# Altium PCB 1SL1 Xilinx Spartan-11E PQ208.PcbDoc (part 1 of 5)
Units mil, origin at the board's own origin, x right, y up, seen from the top; angles counter-clockwise.
Board outline 7086.61 x 1988.19 mil, 2 copper layers (Top Layer, Bottom Layer), stack 29.698 mil thick; 115 components, 126 nets, 642 pads, 225 vias.
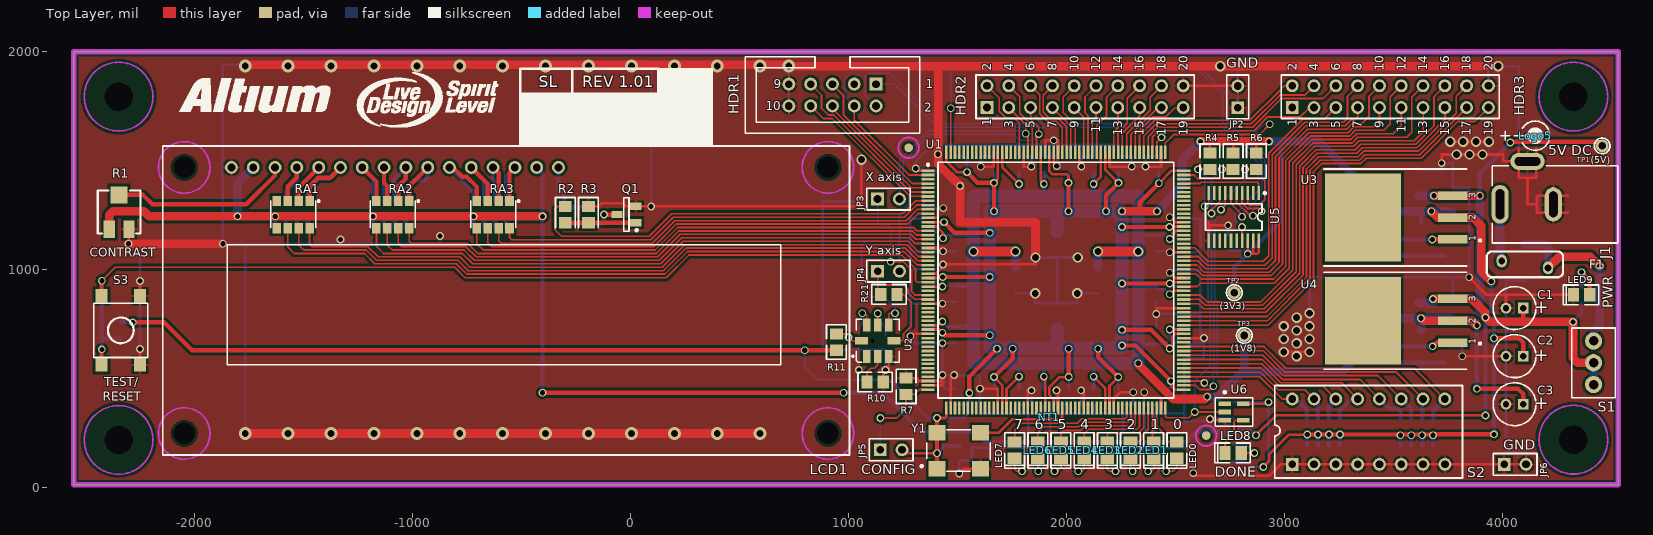
[diagram p0: Top Layer view]
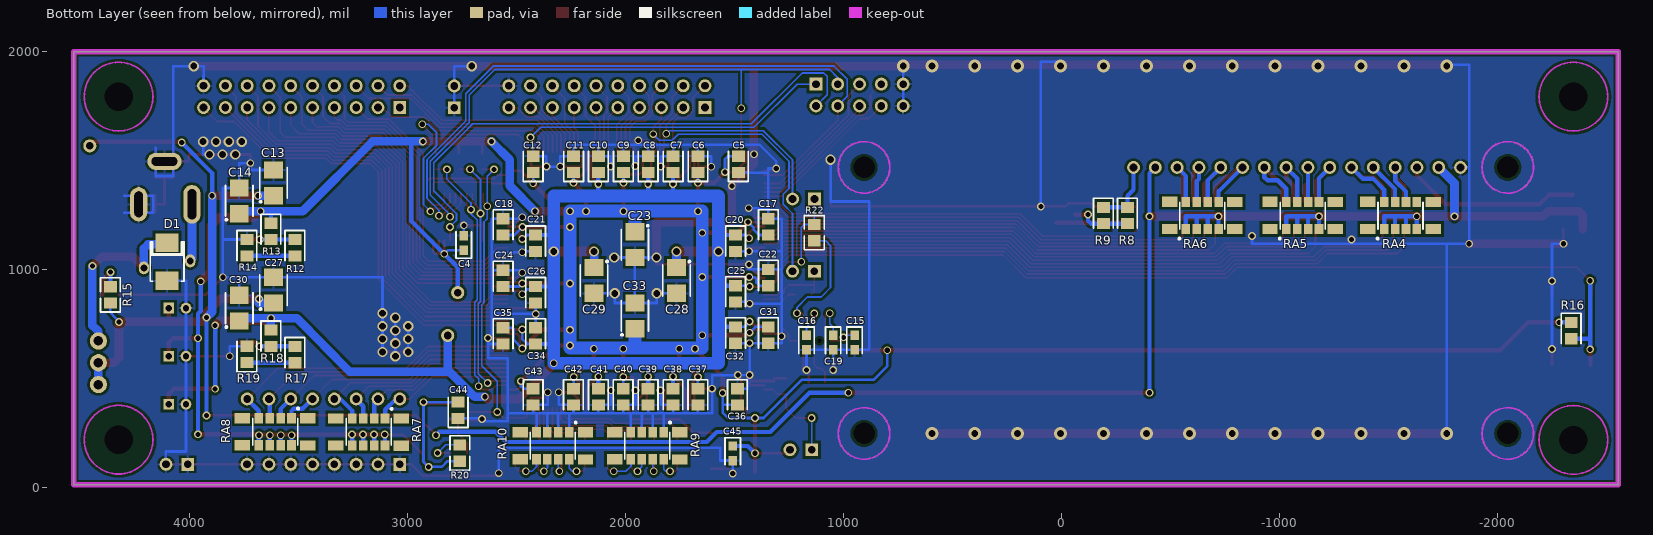
[diagram p1: Bottom Layer view, seen from below]

## Layer stack, top to bottom
Top Solder: solder mask 0.4, Solder Resist, Dk 3.5
Top Layer: signal copper 1.4
Dielectric 1: core 26.898, FR-4, Dk 4.2
Bottom Layer: signal copper 1.4
Bottom Solder: solder mask 0.4, Solder Resist, Dk 3.5

## Board outline
-2555.06,9.87 4531.55,9.87 4531.55,1998.06 -2555.06,1998.06

## Design rules (kind name [scope] priority, off if disabled: settings)
Clearance "Clearance_Power Polygon" [inpolygon and innetclass('Power')] p1: gap=11.81 ignorepadtopadclearanceinfootprint=FALSE except(0: Arc-Hole Track-Hole SMDPad-Hole THPad-Hole Via-Hole Fill-Hole Poly-Hole Region-Hole Text-Hole)
Clearance [All] p2: gap=7.87 ignorepadtopadclearanceinfootprint=FALSE except(0: Arc-Hole Track-Hole SMDPad-Hole THPad-Hole Via-Hole Fill-Hole Poly-Hole Region-Hole Text-Hole) // General
ComponentClearance ComponentClearance_D1_F1 [InComponent('D1') vs InComponent('F1')] p1 off: gap=1.18 collisioncheckmode=3 verticalgap=10 showdistances=FALSE
ComponentClearance ComponentClearance_JP4_R21 [InComponent('JP4') vs InComponent('R21')] p2 off: gap=2.76 collisioncheckmode=3 verticalgap=10 showdistances=FALSE
ComponentClearance ComponentClearance_LCD1_U2 [InComponent('LCD1') vs InComponent('U2')] p3 off: gap=3.54 collisioncheckmode=3 verticalgap=10 showdistances=FALSE
ComponentClearance ComponentClearance_U1_U6 [InComponent('U1') vs InComponent('U6')] p4 off: gap=3.94 collisioncheckmode=3 verticalgap=10 showdistances=FALSE
ComponentClearance ComponentClearance_S2 [InComponent('S2') vs InComponent('RA7') Or InComponent('RA8')] p5 off: gap=3.94 collisioncheckmode=3 verticalgap=10 showdistances=FALSE // Why is such a small clearance necessary?
ComponentClearance ComponentClearance_LCD1_R11 [InComponent('LCD1') vs InComponent('R11')] p6 off: gap=6.3 collisioncheckmode=3 verticalgap=10 showdistances=FALSE
ComponentClearance ComponentClearance_J1_Logo5 [InComponent('J1') vs InComponent('Logo5')] p7 off: gap=7.48 collisioncheckmode=3 verticalgap=10 showdistances=FALSE
ComponentClearance ComponentClearance_R2_R3 [InComponent('R2') vs InComponent('R3')] p8 off: gap=7.48 collisioncheckmode=3 verticalgap=10 showdistances=FALSE
ComponentClearance ComponentClearance_R5 [InComponent('R5') vs InComponent('R4') Or InComponent('R6')] p9 off: gap=7.48 collisioncheckmode=3 verticalgap=10 showdistances=FALSE
ComponentClearance ComponentClearance_LEDs [HasFootprint('SMD _LED') vs HasFootprint('SMD _LED')] p10 off: gap=7.48 collisioncheckmode=3 verticalgap=10 showdistances=FALSE
ComponentClearance ComponentClearance_R7_R10 [InComponent('R7') vs InComponent('R10')] p11 off: gap=9.45 collisioncheckmode=3 verticalgap=10 showdistances=FALSE
ComponentClearance ComponentClearance_U1 [InComponent('U1') vs Not InComponent('NT1') && Not InComponent('LED8')] p12 off: gap=10 collisioncheckmode=3 verticalgap=10 showdistances=FALSE
ComponentClearance ComponentClearance_General [Not InComponent('U1') vs Not InComponent('U1')] p13 off: gap=10 collisioncheckmode=3 verticalgap=10 showdistances=FALSE
ComponentClearance ComponentClearance_Default [All] p14: gap=5 collisioncheckmode=3 verticalgap=10 showdistances=FALSE
FabricationTestPointUsage TestPointUsage [All] p1 off: valid=0 allowmultiple=FALSE
FabricationTestpoint Testpoint [All] p1 off: side=3 testpointundercomponent=TRUE minsize=40 maxsize=100 preferedsize=60 minholesize=0 maxholesize=40 preferedholesize=32 testpointgrid=1 allowsidetop=TRUE allowsidebottom=TRUE usegrid=TRUE gridtolerance=0.01
HoleSize [All] p1: absolutevalues=TRUE maxlimit=130 minlimit=0 maxpercent=80.000 minpercent=20.000
PlaneConnect [All] p1: planeconnectstyle=Relief reliefexpansion=11.81 reliefentries=4 reliefconductorwidth=7.87 reliefairgap=7.87
PolygonConnect PolygonConnect_Power [innetclass('Power')] p1: thpad.connectstyle=Relief thpad.reliefconductorwidth=11.81 thpad.reliefentries=4 thpad.polygonreliefangle="90 Angle" thpad.airgapwidth=10 smdpad.connectstyle=Relief smdpad.reliefconductorwidth=11.81 smdpad.reliefentries=4 smdpad.polygonreliefangle="90 Angle" smdpad.airgapwidth=10 via.connectstyle=Direct via.reliefconductorwidth=11.81 via.reliefentries=4 via.polygonreliefangle="90 Angle" via.airgapwidth=10
PolygonConnect [All] p2: connectstyle=Relief reliefconductorwidth=7.87 reliefentries=4 polygonreliefangle="90 Angle" airgapwidth=10
RoutingVias RoutingVias_Power [innetclass('Power')] p1: holewidth=23.62 width=35.43 viastyle="Through Hole" minholewidth=23.62 minwidth=35.43 maxholewidth=31.5 maxwidth=59.06
RoutingVias [All] p2: holewidth=23.62 width=35.43 viastyle="Through Hole" minholewidth=23.62 minwidth=35.43 maxholewidth=23.62 maxwidth=35.43
SilkToSolderMaskClearance SilkscreenOverComponentPads [IsPad] p1: minsilkscreentomaskgap=10 clearancetoexposedcopper=TRUE
SolderMaskExpansion SolderMaskExpansion_Power_Vias [isvia] p1: expansion=0 istentingtop=FALSE
SolderMaskExpansion [All] p2: expansion=3.94 istentingtop=FALSE
Width Width_Power [innetclass('Power') and not inpolygon] p1: maxlimit=78.74 minlimit=11.81 preferedwidth=11.81
Width [All] p2: maxlimit=78.74 minlimit=7.87 preferedwidth=7.87
24 further rules are at their usual default settings.

## Classes and differential pairs
net class Power: 5V GND VCCINT VCCO

## Components (designator, comment, footprint, x,y, rotation, side; value= is the part's Value field where it differs from the comment)
C1 "100uF 16V" CAPPR2-5X6.8 4055.17,820.9 r180 top
C2 "100uF 16V" CAPPR2-5X6.8 4055.17,600.43 r180 top
C3 "100uF 16V" CAPPR2-5X6.8 4055.17,379.95 r180 top
C4 "10nF" CC1608-0603 2741.2,1120.11 r90 bottom
C5 "0.1uF" CC2012-0805 1482.34,1480.35 r90 bottom
C6 "0.1uF" CC2012-0805 1667.38,1480.35 r90 bottom
C7 "0.1uF" CC2012-0805 1781.55,1480.35 r90 bottom
C8 "0.1uF" CC2012-0805 1895.72,1480.35 r90 bottom
C9 "0.1uF" CC2012-0805 2009.9,1480.35 r90 bottom
C10 "0.1uF" CC2012-0805 2124.07,1480.35 r90 bottom
C11 "0.1uF" CC2012-0805 2238.24,1480.35 r90 bottom
C12 "0.1uF" CC2012-0805 2423.28,1480.35 r90 bottom
C13 "10uF" MCCT-B 3614.23,1395.7 r90 bottom
C14 "10uF" MCCT-B 3771.71,1313.02 r90 bottom
C15 "100nF" CC1608-0603 948.87,663.42 r270 bottom
C16 "100nF" CC1608-0603 1169.35,663.42 r270 bottom
C17 "0.1uF" CC2012-0805 1344.54,1193.93 r270 bottom
C18 "0.1uF" CC2012-0805 2561.08,1193.93 r270 bottom
C19 "100nF" CC1608-0603 1047.3,663.42 r270 bottom
C20 "0.1uF" CC2012-0805 1494.15,1119.13 r270 bottom
C21 "0.1uF" CC2012-0805 2411.47,1119.13 r270 bottom
C22 "0.1uF" CC2012-0805 1344.54,961.65 r270 bottom
C23 "10uF" MCCT-B 1956.75,1112.24 r270 bottom
C24 "0.1uF" CC2012-0805 2561.08,957.71 r270 bottom
C25 "0.1uF" CC2012-0805 1494.15,886.84 r270 bottom
C26 "0.1uF" CC2012-0805 2411.47,882.91 r270 bottom
C27 "10uF" MCCT-B 3614.23,903.57 r90 bottom
C28 "10uF" MCCT-B 1765.8,947.87 r270 bottom
C29 "10uF" MCCT-B 2143.76,947.87 r270 bottom
C30 "10uF" MCCT-B 3771.71,820.9 r90 bottom
C31 "0.1uF" CC2012-0805 1344.54,697.87 r270 bottom
C32 "0.1uF" CC2012-0805 1494.15,697.87 r270 bottom
C33 "10uF" MCCT-B 1956.75,785.46 r90 bottom
C34 "0.1uF" CC2012-0805 2411.47,693.93 r270 bottom
C35 "0.1uF" CC2012-0805 2561.08,693.93 r270 bottom
C36 "0.1uF" CC2012-0805 1486.28,414.4 r270 bottom
C37 "0.1uF" CC2012-0805 1667.38,414.4 r270 bottom
C38 "0.1uF" CC2012-0805 1781.55,414.4 r270 bottom
C39 "0.1uF" CC2012-0805 1895.72,414.4 r270 bottom
C40 "0.1uF" CC2012-0805 2009.9,414.4 r270 bottom
C41 "0.1uF" CC2012-0805 2124.07,414.4 r270 bottom
C42 "0.1uF" CC2012-0805 2238.24,414.4 r270 bottom
C43 "0.1uF" CC2012-0805 2423.28,414.4 r270 bottom
C44 "0.1uF" CC2012-0805 2767.77,352.39 r90 bottom
C45 "10nF" CC1608-0603 1507.93,155.54 r270 bottom
D1 "SM6T6V8A" DO214 4102.42,1033.46 r90 bottom
F1 "Polyswitch, 1.1A" RUE160_0.2 4102.42,1021.68 r0 top
HDR1 "Header 5X2" HDR2X5_LP 1126.04,1848.46 r0 top
HDR2 "Header 10X2" HDR2X10 1635.49,1740.58 r0 top locked
HDR3 "Header 10X2" HDR2X10 3035.49,1740.58 r0 top locked
J1 "KLD-0202-B" KLD-0202 4527.61,1297.28 r180 top
JP2 "GND" HDR1X2 2785.49,1740.58 r90 top locked
JP3 "X axis" HDR1X2 1133.65,1321.29 r0 top
JP4 "Y axis" HDR1X2 1133.91,990.19 r0 top
JP5 "CONFIG" HDR1X2 1145.72,171.29 r0 top
JP6 "GND" HDR1X2 4007.93,104.36 r0 top
LCD1 "162A" 162A -1830.65,1466.57 r0 top locked
LED0 "HSMH-C170" "SMD _LED" 2505.96,170.31 r90 top
LED1 "HSMH-C170" "SMD _LED" 2399.66,170.31 r90 top
LED2 "HSMH-C170" "SMD _LED" 2293.36,170.31 r90 top
LED3 "HSMH-C170" "SMD _LED" 2187.06,170.31 r90 top
LED4 "HSMH-C170" "SMD _LED" 2080.76,170.31 r90 top
LED5 "HSMH-C170" "SMD _LED" 1974.46,170.31 r90 top
LED6 "HSMH-C170" "SMD _LED" 1868.17,170.31 r90 top
LED7 "HSMH-C170" "SMD _LED" 1761.87,170.31 r90 top
LED8 "HSMH-C170" "SMD _LED" 2763.83,156.53 r0 top
LED9 "HSMH-C170" "SMD _LED" 4362.26,881.92 r0 top
Logo5 "5V" "5V SYMBOL" 4149.66,1612.24 r0 top
NT1 "GND" NT 1920.76,331.68 r270 top net-tie
Q1 "2N7002" SO-G3 -19.63,1250.03 r90 top
R1 "20K" POT4MM-2 -2346.4,1261.84 r90 top
R2 "560R" CC2012-0805 -299.16,1250.03 r270 top
R3 "10K" CC2012-0805 -192.86,1250.03 r270 top
R4 "4K7" CR2012-0805 2657.54,1495.11 r270 top
R5 "4K7" CR2012-0805 2763.83,1495.11 r270 top
R6 "4K7" CR2012-0805 2870.13,1495.11 r270 top
R7 "1K" CR2012-0805 1263.83,462.63 r270 top
R8 "68R" CC2012-0805 -303.09,1246.09 r270 bottom
R9 "68R" CC2012-0805 -192.86,1246.09 r270 bottom
R10 "680R" CR2012-0805 1122.1,482.31 r180 top
R11 "0R" CR2012-0805 944.15,665.39 r90 top
R12 "100R" CC2012-0805 3515.8,1098.45 r270 bottom
R13 "120R" CC2012-0805 3626.04,1173.25 r270 bottom
R14 "100R" CC2012-0805 3736.28,1098.45 r270 bottom
R15 "270R" CR2012-0805 4362.26,881.91 r270 bottom
R16 "4K7" CC2012-0805 -2338.53,718.53 r270 bottom
R17 "47R" CC2012-0805 3515.8,608.29 r270 bottom
R18 "120R" CC2012-0805 3626.04,683.1 r270 bottom
R19 "5R6" CC2012-0805 3736.28,608.3 r90 bottom
R20 "270R" CR2012-0805 2759.9,156.52 r270 bottom
R21 "100R" CR2012-0805 1185.09,883.89 r0 top
R22 "100R" CR2012-0805 1133.91,1167.35 r270 bottom
RA1 "270R" MNR34 -1547.19,1250.03 r270 top
RA2 "270R" MNR34 -1090.5,1250.03 r270 top
RA3 "270R" MNR34 -629.87,1250.03 r270 top
RA4 "4K7" MNR34T -1555.06,1246.09 r270 bottom
RA5 "4K7" MNR34T -1106.24,1246.09 r270 bottom
RA6 "4K7" MNR34T -645.61,1246.09 r270 bottom
RA7 "4K7" MNR34T 3177.42,252.96 r90 bottom
RA8 "4K7" MNR34T 3606.35,253.97 r90 bottom
RA9 "270R" MNR34T 1899.66,189.98 r90 bottom
RA10 "270R" MNR34T 2332.73,189.98 r90 bottom
S1 "TL36WW050" PCB_SWITCH 4417.57,470.06 r90 top
S2 "A6ER-8104" DIP-16-KEY 3035.49,104.36 r0 top
S3 "DTSM-61-NR" B3FS_SWITCH -2338.53,718.54 r270 top
TP1 "(5V)" TP 4456.75,1564.99 r0 top
TP2 "(3V3)" TP 2769.07,891.75 r0 top
TP3 "(1V8)" TP 2815.02,694.91 r0 top
U1 "XC2S300E-6PQ208C" PQ208 1950.84,949.83 r0 top locked
U2 "ADXL202E" E-8 1133.91,671.29 r90 top
U3 "LM1084IS-ADJ" TO-263 3771.71,1136.65 r90 top
U4 "LM1084IS-ADJ" TO-263 3771.71,663.42 r90 top
U5 "XCF02SVO20C" VO20 2766.79,1239.2 r180 top
U6 "SN74LVC1G04DBV" SO-G5/P.95 2767.77,344.52 r270 top
Y1 "25MHz" QSMO_4200 1405.57,68.93 r0 top

## Footprints (in the part's own frame and the unit in brackets; to place one, negate y for a bottom-side part, rotate by r counter-clockwise, add the part's x,y. Pads: shape width x height; smd on the part's side, far side on the other; paste and mask are expansions set on the pad)
"5V SYMBOL" [mil]
  silkscreen extent -158,-67 67,67
162A [mm]
  round 1.5 hole 0.9: 1(0,0) 2(2.54,0) 3(5.08,0) 4(7.62,0) 5(10.16,0) 6(12.7,0) 7(15.24,0) 8(17.78,0) 9(20.32,0) 10(22.86,0) 11(25.4,0) 12(27.94,0) 13(30.48,0) 14(33.02,0) 15(35.56,0) 16(38.1,0)
  round 2.3 hole 2.5 unplated: M1(-5.5,0) M2(69.5,0) M3(-5.5,-31) M4(69.5,-31)
  Keep-Out Layer circle w0.2: c69.5,0 r3
  Keep-Out Layer circle w0.2: c69.5,-31 r3
  Keep-Out Layer circle w0.2: c-5.5,-31 r3
  Keep-Out Layer circle w0.2: c-5.5,0 r3
  silkscreen extent -8,-33.5 72,2.5, body extent -8.01,-33.5 72,2.5, height 10.16
B3FS_SWITCH [mm]
  rect 1.6x1.4 smd: 1(3.998,-2.244) 2(-4.012,-2.244) 3(3.998,2.246) 4(-4.012,2.246)
  silkscreen extent -3.17,-3.15 3.14,3.16, body extent -4.57,-3.15 4.57,3.16, height 4.57
CAPPR2-5X6.8 [mm]
  rect 1.25x1.25 hole 0.75: 1(-0.994,-0.009)
  round 1.25 hole 0.75: 2(1.006,-0.009)
  silkscreen extent -2.49,-2.51 2.5,2.49, body extent -2.49,-2.51 2.51,2.49, height 10.16
CC1608-0603 [mm]
  rect 1.1x1 smd: 1(-0.843,0.001) 2(0.857,0.001)
  silkscreen extent -1.79,-0.9 1.31,0.9, body extent -1.46,-0.57 1.46,0.57, height 0.76
CC2012-0805 [mm]
  rect 1.3x1.5 smd: 1(-0.945,-0.007) 2(0.955,-0.007)
  silkscreen extent -1.99,-1.16 1.51,1.14, body extent -1.52,-0.7 1.52,0.7, height 0.76
CR2012-0805 [mm]
  rect 1.3x1.5 smd: 1(-0.946,0) 2(0.954,0)
  silkscreen extent -2,-1.15 2,1.15, body extent -1.52,-0.7 1.52,0.7, height 0.76
DIP-16-KEY [mm]
  rect 1.5x1.5 hole 0.9: 1(-0.011,0.001)
  round 1.5 hole 0.9: 2(2.529,0.001) 3(5.069,0.001) 4(7.609,0.001) 5(10.149,0.001) 6(12.689,0.001) 7(15.229,0.001) 8(17.789,0.001) 9(17.769,7.621) 10(15.229,7.621) 11(12.689,7.621) 12(10.149,7.621) 13(7.609,7.621) 14(5.069,7.621) 15(2.529,7.621) 16(-0.011,7.621)
  silkscreen extent -2.06,-1.59 19.82,9.2, body extent -2.03,-1.52 19.81,9.14, height 7.11
DO214 [mil]
  rect 85x106.3 smd: 1(-87.01,0.18) 2(87.99,0.18)
  silkscreen extent -90,-77 90,78, body extent -125,-50 125,50, height 50
E-8 [mil]
  round 15 hole 20 unplated: 0(-0.02,23.98)
  rect 60x35 smd: 1(-72.85,49.98) 2(-72.85,-0.02) 3(-72.85,-50.02) 5(72.82,-50.02) 6(72.82,-0.02) 7(72.82,49.98)
  rect 35x60 smd: 4(-0.02,-74.82) 8(-0.02,74.79)
  silkscreen extent -98,-98 99,118, body extent -95,-95 95,95, height 80
HDR1X2 [mm]
  rect 1.5x1.5 hole 0.9: 1(-0.011,0.007)
  round 1.5 hole 0.9: 2(2.529,0.007)
  silkscreen extent -1.28,-1.26 3.8,1.28, body extent -1.27,-1.27 3.81,1.27, height 10
HDR2X5_LP [mm]
  rect 1.5x1.5 hole 0.9: 1(0.003,0.004)
  round 1.5 hole 0.9: 2(0.003,-2.536) 3(-2.537,0.004) 4(-2.537,-2.536) 5(-5.077,0.004) 6(-5.077,-2.536) 7(-7.617,0.004) 8(-7.617,-2.536) 9(-10.157,0.004) 10(-10.157,-2.536)
  silkscreen extent -15.24,-5.71 5.08,3.18, body extent -15.24,-5.71 5.08,3.18, height 10
HDR2X10 [mm]
  rect 1.5x1.5 hole 0.9: 1(-0.011,0.007)
  round 1.5 hole 0.9: 2(-0.011,2.547) 3(2.529,0.007) 4(2.529,2.547) 5(5.069,0.007) 6(5.069,2.547) 7(7.609,0.007) 8(7.609,2.547) 9(10.149,0.007) 10(10.149,2.547) 11(12.689,0.007) 12(12.689,2.547) 13(15.229,0.007) 14(15.229,2.547) 15(17.769,0.007) 16(17.769,2.547) 17(20.309,0.007) 18(20.309,2.547) 19(22.849,0.007) 20(22.849,2.547)
  silkscreen extent -1.28,-1.26 24.12,3.82, body extent -1.27,-1.27 24.13,3.81, height 10
KLD-0202 [mm]
  oval 2x4.5 hole 1 slot 3.5 at 90 deg: 1(13.692,-0.001)
  oval 2x4 hole 1 slot 3 at 90 deg: 2(7.492,-0.001)
  oval 4x2 hole 1 slot 3 at 0 deg: 3(10.492,-5.001)
  silkscreen extent -0.01,-4.5 14.59,4.5, body extent 0,-4.44 14.6,4.45, height 7.62
MCCT-B [mm]
  rect 2x2.2 smd: 1(-1.505,-0.002) 2(1.495,-0.002)
  silkscreen extent -2.3,-1.6 1.8,1.6, body extent -2.29,-0.89 2.29,0.89, height 1.27
MNR34 [mm]
  rect 1.2x1 smd: 1(-1.578,1.898) 2(-1.578,0.628) 3(-1.578,-0.642) 4(-1.578,-1.912) 5(1.572,-1.912) 6(1.572,-0.642) 7(1.572,0.628) 8(1.572,1.898)
  silkscreen extent -1.68,-2.62 1.55,3.06, body extent -2.03,-2.29 2.03,2.29, height 1.27
MNR34T [mm]
  rect 1.2x1 smd: 1(1.575,-1.896) 2(1.575,-0.626) 3(1.575,0.644) 4(1.575,1.914) 5(-1.575,1.914) 6(-1.575,0.644) 7(-1.575,-0.626) 8(-1.575,-1.896)
  rect 1.2x1.8 smd: STP(-1.6,-3.801) STP(-1.575,3.819) STP(1.575,-3.801) STP(1.575,3.819)
  silkscreen extent -1.55,-2.76 2.79,2.62, body extent -1.65,-2.71 1.68,2.72, height 2
NT [mm]
  rect 0.2x0.2 smd: 1(0.01,0.011) 2(0.51,0.011)
  Top Layer lines w0.3: 0.51,0.011 0.01,0.011
PCB_SWITCH [mm]
  round 2 hole 1.1: 1(0.011,0.005) 2(2.551,0.005) 3(5.091,0.005)
  silkscreen extent -1.54,-2.53 6.59,2.55, body extent -1.52,-2.54 6.6,2.54, height 15
POT4MM-2 [mm]
  rect 2x1.3 smd: CCW(-2.008,-1.162) CW(-2.008,1.138)
  rect 2x2 smd: W(1.992,-0.012)
  silkscreen extent -2.51,-2.51 2.49,2.49, body extent -2.92,-2.41 2.92,2.41, height 3.05
PQ208 [mm]
  rect 1.55x0.3 smd: 1(-14.902,12.738) 2(-14.902,12.238) 3(-14.902,11.738) 4(-14.902,11.238) 5(-14.902,10.738) 6(-14.902,10.238) 7(-14.902,9.738) 8(-14.902,9.238) 9(-14.902,8.738) 10(-14.902,8.238) 11(-14.902,7.738) 12(-14.902,7.238) 13(-14.902,6.738) 14(-14.902,6.238) 15(-14.902,5.738) 16(-14.902,5.238) 17(-14.902,4.738) 18(-14.902,4.238) 19(-14.902,3.738) 20(-14.902,3.238) 21(-14.902,2.738) 22(-14.902,2.238) 23(-14.902,1.738) 24(-14.902,1.238) 25(-14.902,0.738) 26(-14.902,0.238) 27(-14.902,-0.262) 28(-14.902,-0.762) 29(-14.902,-1.262) 30(-14.902,-1.762) 31(-14.902,-2.262) 32(-14.902,-2.762) 33(-14.902,-3.262) 34(-14.902,-3.762) 35(-14.902,-4.262) 36(-14.902,-4.762) 37(-14.902,-5.262) 38(-14.902,-5.762) 39(-14.902,-6.262) 40(-14.902,-6.762) 41(-14.902,-7.262) 42(-14.902,-7.762) 43(-14.902,-8.262) 44(-14.902,-8.762) 45(-14.902,-9.262) 46(-14.902,-9.762) 47(-14.902,-10.262) 48(-14.902,-10.762) 49(-14.902,-11.262) 50(-14.902,-11.762) 51(-14.902,-12.262) 52(-14.902,-12.762) 105(14.898,-12.762) 106(14.898,-12.262) 107(14.898,-11.762) 108(14.898,-11.262) 109(14.898,-10.762) 110(14.898,-10.262) 111(14.898,-9.762) 112(14.898,-9.262) 113(14.898,-8.762) 114(14.898,-8.262) 115(14.898,-7.762) 116(14.898,-7.262) 117(14.898,-6.762) 118(14.898,-6.262) 119(14.898,-5.762) 120(14.898,-5.262) 121(14.898,-4.762) 122(14.898,-4.262) 123(14.898,-3.762) 124(14.898,-3.262) 125(14.898,-2.762) 126(14.898,-2.262) 127(14.898,-1.762) 128(14.898,-1.262) 129(14.898,-0.762) 130(14.898,-0.262) 131(14.898,0.238) 132(14.898,0.738) 133(14.898,1.238) 134(14.898,1.738) 135(14.898,2.238) 136(14.898,2.738) 137(14.898,3.238) 138(14.898,3.738) 139(14.898,4.238) 140(14.898,4.738) 141(14.898,5.238) 142(14.898,5.738) 143(14.898,6.238) 144(14.898,6.738) 145(14.898,7.238) 146(14.898,7.738) 147(14.898,8.238) 148(14.898,8.738) 149(14.898,9.238) 150(14.898,9.738) 151(14.898,10.238) 152(14.898,10.738) 153(14.898,11.238) 154(14.898,11.738) 155(14.898,12.238) 156(14.898,12.738)
  rect 0.3x1.55 smd: 53(-12.752,-14.912) 54(-12.252,-14.912) 55(-11.752,-14.912) 56(-11.252,-14.912) 57(-10.752,-14.912) 58(-10.252,-14.912) 59(-9.752,-14.912) 60(-9.252,-14.912) 61(-8.752,-14.912) 62(-8.252,-14.912) 63(-7.752,-14.912) 64(-7.252,-14.912) 65(-6.752,-14.912) 66(-6.252,-14.912) 67(-5.752,-14.912) 68(-5.252,-14.912) 69(-4.752,-14.912) 70(-4.252,-14.912) 71(-3.752,-14.912) 72(-3.252,-14.912) 73(-2.752,-14.912) 74(-2.252,-14.912) 75(-1.752,-14.912) 76(-1.252,-14.912) 77(-0.752,-14.912) 78(-0.252,-14.912) 79(0.248,-14.912) 80(0.748,-14.912) 81(1.248,-14.912) 82(1.748,-14.912) 83(2.248,-14.912) 84(2.748,-14.912) 85(3.248,-14.912) 86(3.748,-14.912) 87(4.248,-14.912) 88(4.748,-14.912) 89(5.248,-14.912) 90(5.748,-14.912) 91(6.248,-14.912) 92(6.748,-14.912) 93(7.248,-14.912) 94(7.748,-14.912) 95(8.248,-14.912) 96(8.748,-14.912) 97(9.248,-14.912) 98(9.748,-14.912) 99(10.248,-14.912) 100(10.748,-14.912) 101(11.248,-14.912) 102(11.748,-14.912) 103(12.248,-14.912) 104(12.748,-14.912) 157(12.748,14.888) 158(12.248,14.888) 159(11.748,14.888) 160(11.248,14.888) 161(10.748,14.888) 162(10.248,14.888) 163(9.748,14.888) 164(9.248,14.888) 165(8.748,14.888) 166(8.248,14.888) 167(7.748,14.888) 168(7.248,14.888) 169(6.748,14.888) 170(6.248,14.888) 171(5.748,14.888) 172(5.248,14.888) 173(4.748,14.888) 174(4.248,14.888) 175(3.748,14.888) 176(3.248,14.888) 177(2.748,14.888) 178(2.248,14.888) 179(1.748,14.888) 180(1.248,14.888) 181(0.748,14.888) 182(0.248,14.888) 183(-0.252,14.888) 184(-0.752,14.888) 185(-1.252,14.888) 186(-1.752,14.888) 187(-2.252,14.888) 188(-2.752,14.888) 189(-3.252,14.888) 190(-3.752,14.888) 191(-4.252,14.888) 192(-4.752,14.888) 193(-5.252,14.888) 194(-5.752,14.888) 195(-6.252,14.888) 196(-6.752,14.888) 197(-7.252,14.888) 198(-7.752,14.888) 199(-8.252,14.888) 200(-8.752,14.888) 201(-9.252,14.888) 202(-9.752,14.888) 203(-10.252,14.888) 204(-10.752,14.888) 205(-11.252,14.888) 206(-11.752,14.888) 207(-12.252,14.888) 208(-12.752,14.888)
  round 1 smd: FID1(-17.152,15.413) FID2(17.523,-18.112)
  Top Layer keep-out circle w0.2: c17.523,-18.137 r1.2
  Top Layer keep-out circle w0.2: c-17.152,15.413 r1.2
  silkscreen extent -15.03,-13.74 13.72,13.71, body extent -15.35,-15.36 15.35,15.34, height 2.5
QSMO_4200 [mm]
  rect 2x1.8 smd: 1(-0.009,0.39) 2(5.071,0.39) 3(5.071,4.59) 4(-0.009,4.59)
  silkscreen extent -1.91,0.09 6.21,4.94, body extent -1.14,-0.32 6.1,5.3, height 1.5
RUE160_0.2 [mm]
  oval 1.2x1.5 hole 0.8: 1(-2.7,0.4) 2(2.7,-0.4)
  silkscreen extent -4.45,-1.5 4.45,1.5, body extent -4.45,-1.5 4.45,1.5, height 12
"SMD _LED" [mm]
  rect 1.3x1.6 smd: 1(0.948,0.006) 2(-0.952,0.006)
  silkscreen extent -2.13,-1.14 2,1.16, body extent -1.52,-0.64 1.52,0.64, height 1.27
SO-G3 [mm]
  rect 0.85x1.3 smd: 1(-0.939,-1.107) 2(0.961,-1.107) 3(0.011,1.093)
  silkscreen extent -1.94,-1.33 1.96,0.29, body extent -1.65,-1.52 1.65,1.51, height 2.54
SO-G5/P.95 [mm]
  rect 0.55x1.45 smd: 1(-0.954,-1.07) 2(-0.004,-1.07) 3(0.946,-1.07) 4(0.946,1.08) 5(-0.954,1.08)
  silkscreen extent -2.43,-2.19 1.65,2.21, body extent -1.27,-1.78 1.27,1.78, height 0.89
TO-263 [mm]
  rect 1x3.4 smd: 1(-0.006,0.009) 2(2.534,0.009) 3(5.074,0.009)
  rect 10.25x8.9 smd: 4(2.534,10.459)
  silkscreen extent -3.11,-3.29 8.19,15.01, body extent -2.29,-1.14 7.37,14.35, height 2.03
TP [mil]
  round 60 hole 35.43: 1(0.14,0.45)
  silkscreen extent -36,-36 36,36, body extent -36,-36 36,36
VO20 [mm]
  rect 0.3x1.65 smd: 1(-2.929,-2.778) 2(-2.279,-2.778) 3(-1.629,-2.778) 4(-0.979,-2.778) 5(-0.329,-2.778) 6(0.321,-2.778) 7(0.971,-2.778) 8(1.621,-2.778) 9(2.271,-2.778) 10(2.921,-2.778) 11(2.921,2.772) 12(2.271,2.772) 13(1.621,2.772) 14(0.971,2.772) 15(0.321,2.772) 16(-0.329,2.772) 17(-0.979,2.772) 18(-1.629,2.772) 19(-2.279,2.772) 20(-2.929,2.772)
  silkscreen extent -3.75,-2.9 3.3,1.55, body extent -3.3,-3.56 3.3,3.55, height 1.52

## Part data
C1 C2 C3: library part CAP_POLAR_1, "Polar Capacitor"
C4 C5 C6 C7 C8 C9 C10 C11 C12 C15 C16 C17 C18 C19 C20 C21 C22 C24 C25 C26 C31 C32 C34 C35 C36 C37 C38 C39 C40 C41 C42 C43 C44 C45: library part CAP, "Capacitor"
  C4 C45: AEMS Code=2100341
  C5 C6 C7 C8 C9 C10 C11 C12 C17 C18 C20 C21 C22 C24 C25 C26 C31 C32 C34 C35 C36 C37 C38 C39 C40 C41 C42 C43 C44: Supplier=FARNELL, Supplier Code=317-287
  C15 C16 C19: AEMS Code=2101550
C13 C14 C23 C27 C28 C29 C30 C33: library part CAP_POLAR, "Polar Capacitor", Capacitor Type=Tant, AEMS Code=2100110, Supplier=FARNELL, Supplier Code=967-117
D1: library part BZG03C13, "Zener Diode, 6.2V, 5W", Manufacturer=Microsemi, Revision=31-Oct-2003
F1: library part "Fuse 2", "Polyswitch 1.1A, Raychem RUE110", Revision="July-2002: Re-released for DXP Platform.", Supplier=FARNELL, Supplier Code=608-907
HDR1: "Header, 5-Pin, Dual row", Revision="17-Jul-2002: Re-released for DXP Platform."
HDR2 HDR3: "Header, 10-Pin, Dual row", Revision="July-2002: Re-released for DXP Platform."
J1: "Low Voltage Power Supply Connector", Manufacturer=Kycon, AEMS Code=3510211
JP2 JP3 JP4 JP5 JP6: library part "Jumper, 2-Pin", "Jumper, 2-Pin"
LCD1: "16 char * 2 line LCD character display with b/light"
LED0 LED1 LED2 LED3 LED4 LED5 LED6 LED7 LED8 LED9: library part HSMX-C670, "Typical RED GaAs SMD LED Agilent make", AEMS Code=2610081, Revision="July-2002: Re-released for DXP Platform."
NT1: library part "Jumper, 2-Pin_1", "Jumper, 2-Pin"
Q1: "N Channel Mosfet"
R1: library part "RPot SM", "Square Trimming Potentiometer", AEMS Code=1400226
R2 R3 R4 R5 R6 R7 R8 R9 R11 R12 R13 R14 R15 R16 R17 R18 R19 R20: library part RES, "Resistor"
  R2: AEMS Code=1200723
  R3: AEMS Code=1200006JT
  R4 R5 R6 R16: AEMS Code=1200226
  R7: AEMS Code=1200008JN
  R8 R9: AEMS Code=1200821
  R11: AEMS Code=1200075
  R12 R14: AEMS Code=1200012JT
  R13 R18: AEMS Code=1200781
  R15 R20: AEMS Code=1200430
  R17: AEMS Code="CHANGED VALUE"
  R19: AEMS Code=1200069
R10 R21 R22: library part Res1, "Resistor", Revision="July-2002: Re-released for DXP Platform."
  R10: AEMS Code="CHANGED VALUE"
  R21 R22: AEMS Code=1200012JT
RA1 RA2 RA3 RA4 RA5 RA6 RA7 RA8 RA9 RA10: library part MNR34, "3216x4 Resistor Array"
  RA1 RA2 RA3 RA9 RA10: AEMS Code=1310010
  RA4 RA5 RA6 RA7 RA8: AEMS Code=1300330
S1: library part PCB_MOUNT_SWITCH, "SPDT Subminiature Toggle Switch", Supplier=FARNELL, Supplier Code=150-559
S2: "DIP Switch Side actuator long liver Piano Key", Revision="July-2002: Re-released for DXP Platform."
S3: library part B3FS, "SPNA SMD Keyboard Switch"
TP1 TP2 TP3: library part TestPin
U1: "Spartan-IIE 1.8V FPGA, 208-Pin PQFP, Standard Performance, Commercial Grade", PackageDocument="ver1.1, Oct-2002", Code_JEDEC=MS-029-FA-1, ComponentLink1Description="Manufacturer Link", ComponentLink1URL=http://www.xilinx.com/xlnx/xil_prodcat_landingpage.jsp?title=Spartan-IIE, DatasheetDocument=09-Jul-2003, LatestRevisionDate=17-Sep-2003, LatestRevisionNote="Pin names updated to match datasheet, ver2.1.", PackageReference=PQ208, Published=19-Jul-2002, Publisher="Altium Limited"
U2: "Accelerometer with Digital Output"
U3 U4: "5A Low Dropout Possitive Regulators"
U5: "XCF00S Series, Platform Flash In-System Programmable Configuration 3.3V PROM, 20-Pin TSOP, 2-Megabit, Commercial Grade", PackageDocument="ver1.0, May-2003", AEMS Code="CHANGED VALUE", Code_JEDEC=MO-153-AC, DatasheetDocument="ver2.3, May-2004", PackageReference=VO20
U6: library part SN74AHC1G04DBVR, Manufacturer=TI
Y1: library part QSMO_4200, "Surface Mount Crystal Oscillator"

## Free pads (board coordinates)
  round 35.43 hole 23.62 mask+3.94: 0(1430.17,660.46)
  round 118.11 hole 129.92 unplated: M3(-2348.37,216.57) M3(-2348.37,1791.37) M3(4324.86,1791.37) M3(4324.86,217.55)

## Via types
v1: diameter 35.43, hole 23.62, Top Layer to Bottom Layer, tented both sides, 168 vias
v2: diameter 59.06, hole 31.5, Top Layer to Bottom Layer, tented both sides, 27 vias
v3: diameter 47.24, hole 31.5, Top Layer to Bottom Layer, 18 vias
v4: diameter 47.24, hole 31.5, Top Layer to Bottom Layer, tented both sides, 11 vias
v5: diameter 35.43, hole 23.62, Top Layer to Bottom Layer, 1 vias

## Nets (pads, with @x,y where several pads share a name; then routed paths per layer and width w, separated by ;. In a path a pad name is that pad's centre, name@x,y a point inside that pad or via, vN(x,y) a via of type N, cw(c..) or ccw(c..) an arc to the next point about the centre after c; other vN are vias at no path point)
5V: C1.1 C13.1 C27.1 LCD1.2 LCD1.15 R1.CW R15.2 RA4.1 RA4.2 RA4.3 RA4.4 RA5.1 RA5.2 RA5.3 RA5.4 RA6.1 RA6.2 RA6.3 RA6.4 S1.1 S1.2 TP1.1 U3.3 U4.3 | length 12355.5
  Top Layer w11.81: v1(2869.15,238.22) 2959.7,328.77 v1(3921.32,328.77)
  Top Layer w19.68: v1(-403.49,433.1) v1(977.42,433.1) ; v1(4035.49,1580.74) 4039.43,1584.68 4444.94,1584.68 TP1.1@4464.62,1564.99 ; 4094.54,757.91 C1.1@4094.54,820.9
  Top Layer w39.37: R1.CW@-2391.68,1183.1 -2391.68,1248.06 -2373.96,1265.78 -2232.23,1265.78 -2208.61,1242.16 v1(-403.49,1242.16) ; v1(3681.16,863.22) 3858.32,864.2 3921.32,801.21 v1(3921.32,778.57) 3941.98,757.91 v1(4322.89,757.91) 4322.89,592.55 4344.94,570.5 S1.2@4417.38,570.5 ; v1(3685.09,1336.65) v1(3895.72,1336.65)
  Bottom Layer w11.81: v1(4322.89,757.91) 4362.26,801.21 R15.2@4362.26,844.52
  Bottom Layer w19.68: RA4.4@-1630.06,1184.09 v1(-1629.87,1242.16) -1479.87,1242.16 ; RA4.3@-1580.06,1184.09 -1580.06,1241.96 ; RA4.2@-1530.06,1184.09 -1530.06,1241.96 ; RA4.1@-1480.06,1184.09 -1480.06,1241.96 ; RA5.4@-1181.24,1184.09 v1(-1181.05,1242.16) -1031.05,1242.16 ; RA5.3@-1131.24,1184.09 -1131.24,1241.96 ; RA5.2@-1081.24,1184.09 -1081.24,1241.96 ; RA5.1@-1031.24,1184.09 -1031.24,1241.96 ; RA6.4@-720.61,1184.09 v1(-720.42,1242.16) -570.42,1242.16 ; RA6.3@-670.61,1184.09 -670.61,1241.96 ; RA6.2@-620.61,1184.09 -620.61,1241.96 ; RA6.1@-570.61,1184.09 -570.61,1241.96 ; LCD1.15@-430.65,1466.57 -403.49,1439.4 v1(-403.49,433.1) ; v1(977.42,433.1) 1155.57,433.1 1334.7,253.97 1580.76,252.98 1627.02,206.72 2547.3,206.72 2594.54,253.97 2853.4,253.97 v1(2869.15,238.22) ; v1(3895.72,1336.65) 3895.72,1440.98 v1(4035.49,1580.74) ; v1(3921.32,328.77) v1(3921.32,778.57)
  Bottom Layer w39.37: v1(-1803.09,1242.16) -1803.09,1394.13 LCD1.2@-1730.65,1466.57 ; C27.1@3614.23,844.52 3681.16,844.52 v1(3681.16,863.22) ; C13.1@3614.23,1336.65 v1(3685.09,1336.65) ; v1(3895.72,1336.65) 3895.72,804.17 v1(3921.32,778.57) ; S1.1@4417.38,470.5 S1.2@4417.38,570.5
CCLK: U1.155 U5.3 | length 609.9
  Top Layer w7.87: U1.155@2537.46,1432.12 2583.72,1432.12 2600.45,1415.39 2899.66,1415.39 2909.5,1405.54 2909.5,1316.96 2886.87,1294.32 2837.65,1294.32 2830.76,1301.21 U5.3@2830.76,1348.46
CLK_BRD: NT1.2 U1.80 Y1.3 | length 446
  Top Layer w11.81: Y1.3@1605.57,250.03 1689.03,250.03 1750.06,311.06 1970.53,311.06 1980.28,320.81 U1.80@1980.28,362.75
CLK_BRD_1: NT1.1 U1.77
DIN: U1.153 U5.1 | length 393.1
  Top Layer w7.87: U1.153@2537.46,1392.75 2612.26,1392.75 2618.17,1398.65 2875.06,1398.65 2881.94,1391.76 U5.1@2881.94,1348.46
DONE: R4.2 U1.104 U5.10 U6.2 | length 1614
  Top Layer w7.87: U1.104@2452.81,363.22 2452.81,324.83 2459.7,317.94 2561.08,317.94 v1(2587.65,344.52) U6.2@2725.45,344.52 ; v1(2602.42,1457.71) R4.2@2657.54,1457.71 ; v1(2633.91,1288.42) 2651.63,1306.13 U5.10@2651.63,1348.46
  Bottom Layer w7.87: v1(2587.65,344.52) 2587.65,485.27 2659.5,557.12 2659.5,835.31 2648.68,846.13 2648.68,1216.13 2633.91,1230.9 2633.91,1426.21 v1(2602.42,1457.71)
GND: C1.2 C2.2 C3.2 C4.2 C5.1 C6.2 C7.2 C8.2 C9.2 C10.2 C11.2 C12.2 C13.2 C14.2 C15.2 C16.2 C17.1 C18.1 C19.2 C20.2 C21.2 C22.1 C23.2 C24.1 C25.2 C26.2 C27.2 C28.2 C29.2 C30.2 C31.2 C32.2 C33.2 C34.1 C35.2 C36.1 C37.2 C38.2 C39.2 C40.2 C41.2 C42.2 C43.2 C44.1 C45.2 D1.1 HDR1.9 HDR1.10 HDR2.20 HDR3.20 J1.2 J1.3 JP2.1 JP2.2 JP6.1 JP6.2 LCD1.1 LED9.2 pad.0 Q1.2 R1.CCW R3.1 R7.1 R10.1 R14.1 R19.2 RA9.1 RA9.2 RA9.3 RA9.4 RA10.1 RA10.2 RA10.3 RA10.4 S2.1 S2.2 S2.3 S2.4 S2.5 S2.6 S2.7 S2.8 S3.3 S3.4 U1.1 U1.12 U1.19 U1.25 U1.32 U1.39 U1.50 U1.51 U1.54 U1.65 U1.72 U1.79 U1.85 U1.92 U1.103 U1.117 U1.124 U1.131 U1.137 U1.144 U1.158 U1.170 U1.177 U1.182 U1.183 U1.185 U1.190 U1.197 U2.3 U5.11 U6.3 Y1.2 | length 42228.3
  Top Layer w11.81: v1(-2303.09,1116.17) -2301.13,1118.14 R1.CCW@-2301.13,1183.1 ; S3.3@-2250.34,560.66 v1(-2250.34,633.5) ; S3.4@-2250.34,876.02 v1(-2250.34,945.31) ; R3.1@-192.86,1287.43 -147.58,1287.43 -133.8,1301.21 -32.42,1301.21 -18.64,1287.43 23.68,1287.43 v1(94.54,1287.43) 1059.11,1287.43 v4(1059.11,1502) ; R10.1@1159.5,482.31 1159.5,537.43 v1(1169.35,537.43) 1183.91,537.43 U2.3@1183.91,598.46 ; R7.1@1263.39,500.24 1317.97,500.24 1317.97,486.76 U1.50@1364.14,486.76 1430.17,486.76 ; v1(1283.52,691.96) 1283.52,703.3 U1.39@1364.14,703.3 ; v1(1308.13,1461.65) 1308.13,1451.8 U1.1@1364.23,1451.8 ; U1.32@1364.14,841.09 v1@1430.17,841.09 ; U1.25@1364.14,978.89 1401.1,978.89 1433.13,1010.91 v1(1433.13,1021.68) 1857.34,1021.68 v4(1857.34,1053.18) ; U1.19@1364.14,1097 1433.13,1097 v1(1433.13,1081.72) ; U1.12@1364.14,1234.8 1409.5,1234.8 1409.5,1279.56 v1(1434.11,1279.56) ; U1.51@1364.23,467.55 1430.17,467.55 1430.17,486.76 ; v1(1430.17,514.8) 1430.17,486.76 ; U1.54@1468.47,365.06 1468.47,513.81 v1(1484.31,513.81) ; v1(1507.93,62.04) 1530.57,84.68 Y1.2@1605.57,84.68 ; v1(1602.42,451.8) 1685.01,451.8 U1.65@1685.01,362.75 ; v1(1606.35,1469.52) 1665.32,1469.52 U1.197@1665.32,1535.98 ; U1.190@1803.12,1535.98 1803.12,1470.5 v1(1837.65,1470.5) ; U1.72@1822.8,362.75 1822.8,443.93 v1(1838.64,443.93) ; U1.185@1901.54,1535.98 1901.54,1590.58 ; 1901.63,1590.58 v1(1941,1590.58) 1960.6,1590.58 ; U1.183@1940.91,1535.98 1940.91,1473.39 v1(1954.78,1473.39) ; v1(1953.8,443.93) v1@1960.69,443.93 ; U1.79@1960.6,362.75 1960.6,398 v1@1960.69,443.92 ; U1.182@1960.6,1535.98 1960.6,1590.58 ; 1960.69,1590.58 1960.6,1590.58 ; v1@2059.02,1470.5 U1.177@2059.02,1535.98 ; v1(2066.98,443.93) v1@2078.71,443.93 ; U1.85@2078.71,362.75 v1@2078.71,443.93 ; v1@2078.8,443.93 v1@2078.71,443.93 ; U1.170@2196.82,1535.98 2196.82,1470.5 v1(2299.27,1470.5) ; U1.92@2216.5,362.75 2216.5,405.5 2246.07,435.07 v1(2306.16,435.07) ; v1(2356.35,435.07) 2356.35,409.48 2433.04,409.48 U1.103@2433.04,362.75 ; v1(2362.26,1470.5) 2433.04,1470.5 ; v1(2411.47,794.32) 2411.47,821.41 U1.124@2537.37,821.41 ; U1.158@2433.04,1535.98 2433.04,1470.5 ; 2433.13,1470.5 2433.04,1470.5 ; v1(2473.48,983.3) 2497.57,959.2 U1.131@2537.37,959.2 ; v5(2473.48,1077.32) U1.137@2537.37,1077.32 ; v1(2473.48,1238.22) 2496.59,1215.11 U1.144@2537.37,1215.11 ; HDR2.20@2535.49,1840.58 JP2.2@2785.49,1840.58 ; U1.117@2537.37,683.61 v1@2629.98,683.61 ; v1(2580.76,64.01) 2590.61,52.2 2930.17,52.2 2982.34,104.36 S2.6@3535.05,104.42 JP6.2@4107.93,104.36 ; U5.11@2651.63,1129.95 2651.63,1200.82 ; 2651.63,1215.58 2651.63,1200.82 ; v1(2657.52,312.04) 2657.54,307.12 U6.3@2725.45,307.12 ; v1(2741.2,1200.82) 2651.63,1200.82 ; v3(2996.12,620.11) v3@3055.17,620.11 ; v3(3055.17,600.43) v3@3055.17,620.11 ; v3(3114.23,620.11) v3@3055.17,620.11 ; v1(3720.53,1486.25) 3720.53,1525.62 v3(3789.43,1525.62) v3(3848.48,1525.62) v3(3907.54,1525.62) 4003.01,1525.62 4003.01,1494.13 4074.86,1494.13 J1.3@4074.86,1486.25 ; v3(3759.9,1584.68) v3(3818.95,1584.68) v3(3878.01,1584.68) v3(3937.06,1584.68) ; v1(3815.02,600.43) C2.2@4015.8,600.43 ; v1(3846.51,962.63) 3927.22,881.92 4015.8,881.92 ; C1.2@4015.8,836.65 4015.8,881.92 ; 4074.86,1555.34 4074.86,1419.32 4114.23,1419.32 ; 4153.6,1555.34 4153.6,1419.32 4114.23,1419.32 ; 4234.31,881.92 4324.86,881.92 4015.8,881.92 ; 4299.27,1257.91 4157.54,1257.91 4157.54,1298.26 ; 4299.27,1336.65 4232.65,1336.65 4157.54,1336.65 4157.54,1298.26 ; 4114.23,1419.32 4114.23,1298.26 4157.54,1298.26
  Top Layer w39.37: v1(-2303.09,1116.17) v1(-1870.02,1116.17) ; v2(-1767.66,246.09) v2(-1570.81,246.09) v2(-1373.96,246.09) v2(-1177.11,246.09) v2(-980.26,246.09) v2(-783.41,246.09) v2(-586.56,246.09) v2(-389.71,246.09) v2(-192.86,246.09) v2(3.99,246.09) v2(200.84,246.09) v2(397.69,246.09) v2(594.54,246.09) ; v2@-1767.66,1937.04 -980.26,1937.04 -389.71,1937.04 v2@725.45,1937.04 ; v2(725.45,1931.13) 1410.49,1931.13 ; 1410.49,1931.33 1410.49,1931.13 ; v4(1857.34,1053.18) 1857.34,1214.6 1511.87,1214.6 v1(1511.87,1380.94) 1410.49,1482.31 v1(1410.49,1526.61) 1410.49,1931.13 ; v4(3980.37,1931.13) v4(2704.76,1931.13) 1410.49,1931.13
  Bottom Layer w11.81: v1(-2303.09,1116.17) -2250.34,1116.17 v1(-2250.34,945.31) v1(-2250.34,633.5) ; LCD1.1@-1830.65,1466.57 -1870.02,1466.57 ; v2(-1767.66,246.09) -1767.66,1116.17 ; v2@-1767.66,1937.04 -1870.02,1937.04 -1870.02,1466.57 ; v1(-1330.65,1135.86) -1330.65,1116.17 ; v1(-873.97,1151.61) -873.97,1116.17 -1330.65,1116.17 ; v2@3.99,1950.81 94.54,1950.81 v1(94.54,1287.43) ; HDR1.9@725.45,1849.05 v2(725.45,1931.13) v2@725.45,1937.04 ; HDR1.10@726.04,1748.46 HDR1.9@726.04,1848.46 ; v1(1047.3,537.42) C19.2@1047.3,629.95 ; v4(1059.11,1502) 1059.11,1310.07 881.94,1310.07 881.94,629.95 C19.2@1047.3,629.95 ; v1@1170.43,548.36 v1(1169.35,537.43) 1169.35,629.95 C19.2@1047.3,629.95 ; v1(1433.13,1021.68) 1433.13,999.05 1344.54,999.05 1283.52,999.05 ; v1(1434.11,1279.56) 1344.54,1279.56 ; 1439.82,451.81 1439.82,505.15 v1(1430.17,514.8) ; 1439.83,451.8 C36.1@1486.28,451.8 ; C5.1@1482.34,1442.94 1344.54,1442.94 ; C32.2@1494.15,660.46 pad.0@1430.17,660.46 ; C25.2@1494.15,849.44 1438.05,849.44 v1(1430.17,841.57) 1283.52,841.57 ; C20.2@1494.15,1081.72 v1(1433.13,1081.72) 1283.52,1081.72 ; v1(1507.93,62.04) 1507.93,122.08 1565.02,122.08 1565.02,180.15 2580.76,180.15 v1(2580.76,64.01) ; v1(1606.35,1469.52) 1606.35,1517.75 1667.38,1517.75 1667.38,1569.91 ; C37.2@1667.38,377 1667.38,376.79 1667.38,339.6 ; C28.2@1765.8,888.81 v4(1856.35,888.81) 1856.35,844.52 C33.2@1956.75,844.52 ; RA9.1@1824.66,251.99 1824.66,339.4 ; v1(1837.65,1470.5) 1837.65,1517.75 1781.55,1517.75 1781.55,1517.96 1781.55,1569.91 ; v1(1838.64,443.93) 1838.64,377 1781.55,377 1781.55,340.58 1780.57,339.6 ; v4(1857.34,1053.18) C23.2@1956.75,1053.18 ; RA9.2@1874.66,251.99 1874.66,339.4 ; 1895.72,339.6 C39.2@1895.72,377 ; RA9.3@1924.66,251.99 1924.66,339.4 ; v1(1941,1590.58) 1941,1569.91 ; v1(1953.8,443.93) 1953.8,377 2009.9,377 2009.9,339.6 ; v1(1954.78,1473.39) 1954.78,1517.75 1895.72,1517.75 1895.72,1569.91 ; RA9.4@1974.66,251.99 1974.66,339.4 ; C9.2@2009.9,1517.75 2009.9,1569.91 ; v4(2051.24,1053.18) 1956.82,1053.18 C23.2@1956.75,1053.18 ; v1(2066.98,443.93) 2066.98,377 2124.07,377 2124.07,339.6 ; v1(2067.97,1470.5) 2067.97,1517.75 2124.07,1517.75 2124.07,1517.96 2124.07,1569.91 ; C29.2@2143.76,888.81 v4(2049.27,888.81) 2049.27,844.52 C33.2@1956.75,844.52 ; 2238.24,339.6 2238.24,377 2306.16,377 v1(2306.16,435.07) ; RA10.1@2257.73,251.99 2257.73,339.4 ; RA10.2@2307.73,251.99 2307.73,339.4 ; v1(2356.35,435.07) 2356.35,377 2423.28,377 2423.28,339.6 ; RA10.3@2357.73,251.99 2357.73,339.4 ; RA10.4@2407.73,251.99 2407.73,339.4 ; C34.1@2411.47,731.33 v1(2411.47,794.32) ; C26.2@2411.47,845.5 v1(2411.47,794.32) ; C21.2@2411.75,1081.51 2455.66,1081.5 2459.85,1077.32 v5(2473.48,1077.32) ; C12.2@2423.28,1517.75 2362.26,1517.75 v1(2362.26,1470.5) v1(2299.27,1470.5) 2299.27,1517.75 2238.24,1517.75 2238.24,1569.91 2124.07,1569.91 ; v1(2473.48,983.3) 2485.29,995.11 2561.08,995.11 2612.26,995.11 ; v5@2473.48,1077.79 2612.26,1077.79 ; v1(2473.48,1238.22) 2480.37,1231.33 2561.08,1231.33 2612.26,1231.33 2612.26,995.11 ; C35.2@2561.08,656.53 2629.98,656.53 ; 2612.26,794.32 v1(2411.47,794.32) ; v4(2704.76,1931.13) 2785.49,1931.13 JP2.1@2785.49,1740.58 ; C4.2@2741.2,1153.57 v1(2741.2,1200.82) ; C44.1@2767.77,314.99 2670.33,314.99 v1(2657.52,312.04) 2657.54,301.21 2539.43,301.21 2539.43,339.6 ; v3(2996.12,620.11) v3(2996.12,679.17) v3(2996.12,738.22) ; v3(3055.17,600.43) v3(3055.17,659.48) v3(3055.17,718.54) v3(3055.17,777.59) ; v3(3114.23,620.11) v3(3114.23,679.17) v3(3114.23,738.22) v3(3114.23,797.28) 3114.23,962.63 3614.23,962.63 3771.71,962.63 ; C13.2@3614.23,1454.76 3720.53,1454.76 v1(3720.53,1486.25) 3771.71,1486.25 3771.71,1372.08 3846.51,1372.08 ; R19.2@3736.28,645.7 3815.02,645.7 v1(3815.02,600.43) ; R14.1@3736.28,1135.86 3846.51,1135.86 ; C30.2@3771.71,879.95 3771.71,962.63 ; 3844.54,1372.08 3846.51,1372.08 ; v3(3907.54,1525.62) 3937.06,1525.62 v3(3937.06,1584.68) ; HDR3.20@3935.49,1840.58 3935.49,1840.86 3935.09,1931.13 v4(3980.37,1931.13) 4074.86,1931.13 4074.86,1427.2 4153.6,1427.2 4153.6,1494.17 4153.6,1557.12 ; D1.1@4102.42,945.99 4015.8,945.9 4015.8,163.42 4107.93,163.42 JP6.2@4107.93,104.36 ; 4299.27,1257.91 4165.41,1257.91 4165.41,1336.65 4232.65,1336.65 4299.27,1336.65 ; -1870.02,1466.57 v1(-1870.02,1116.17) -1767.66,1116.17 ; -1767.66,1116.17 -1330.65,1116.17 ; 1283.52,841.57 1283.52,999.05 ; 1283.52,841.57 v1(1283.52,691.96) 1283.52,660.46 1344.54,660.46 pad.0@1430.17,660.46 ; 1283.52,999.05 1283.52,1081.72 ; 1283.52,1081.72 1283.52,1231.33 1344.54,1231.33 1344.54,1279.56 ; 1344.54,1279.56 1344.54,1442.94 ; 1344.54,1442.94 1344.54,1461.65 v1(1308.13,1461.65) 1308.13,1494.13 1383.91,1569.91 1667.38,1569.91 ; v1(1430.17,514.8) pad.0@1430.17,660.46 ; v1(1430.17,514.8) v1(1484.31,513.81) 1602.42,513.81 v1(1602.42,451.8) 1602.42,339.6 1667.38,339.6 ; 1667.38,339.6 1780.57,339.6 ; 1667.38,1569.91 1781.55,1569.91 ; 1780.57,339.6 2423.28,339.6 ; 1781.55,1569.91 1895.72,1569.91 ; 1895.72,1569.91 1941,1569.91 ; 1941,1569.91 2009.9,1569.91 ; C33.2@1956.75,844.52 C23.2@1956.75,1053.18 ; 2009.9,1569.91 2124.07,1569.91 ; 2423.28,339.6 2539.43,339.6 ; 2539.43,339.6 2539.43,591.57 2629.98,591.57 2629.98,656.53 ; 2612.26,995.11 2612.26,705.74 2629.98,688.02 v1(2629.98,684.09) 2629.98,656.53 ; 3771.71,962.63 v1(3846.51,962.63) 3846.51,1135.86 ; 3846.51,1135.86 3846.51,1372.08
  other v2: -1767.66,1931.13 -1570.81,1931.13 -1373.96,1931.13 -1177.11,1931.13 -980.26,1931.13 -783.41,1931.13 -586.56,1931.13 -389.71,1931.13 -192.86,1931.13 3.99,1931.13 200.84,1931.13 397.69,1931.13 594.54,1931.13
HA2: HDR2.2 U1.191 | length 388.5
  Top Layer w7.87: HDR2.2@1635.49,1840.58 1691,1785.07 1691,1723.46 1720.21,1694.25 1759.55,1694.25 1783.52,1670.28 U1.191@1783.52,1536.45
HA3: HDR2.3 JP3.2 U1.189 | length 1060.3
  Top Layer w7.87: HDR2.3@1735.49,1740.58 1813.05,1663.02 v1(1813.05,1621.09) 1822.89,1609.28 U1.189@1822.89,1536.45
  Bottom Layer w7.87: JP3.2@1233.65,1321.29 1233.65,1501.35 1367.18,1634.87 1799.27,1634.87 v1(1813.05,1621.09)
HA4: HDR2.4 U1.188 | length 348.5
  Top Layer w7.87: HDR2.4@1735.49,1840.58 1785.49,1790.58 1785.49,1714.77 1842.57,1657.68 U1.188@1842.57,1536.45
HA5: HDR2.5 JP4.2 U1.187 | length 1452.9
  Top Layer w7.87: HDR2.5@1835.49,1740.58 1835.49,1687.04 1872.1,1650.43 v1(1872.1,1619.13) 1862.26,1609.28 U1.187@1862.26,1536.45
  Bottom Layer w7.87: JP4.2@1233.65,990.58 1233.65,1255.28 1275.65,1297.28 1275.65,1344.52 1249.4,1370.76 1249.4,1494.82 1373.7,1619.13 1757.92,1619.13 1785.48,1591.57 1844.54,1591.57 v1(1872.1,1619.13)
HA6: HDR2.6 U1.181 | length 388.5
  Top Layer w7.87: HDR2.6@1835.49,1840.58 1877.02,1799.05 1877.02,1713 1911.84,1678.18 1953.35,1678.18 1980.37,1651.16 U1.181@1980.37,1536.45
HA7: HDR2.7 U1.179 | length 239
  Top Layer w7.87: HDR2.7@1935.49,1740.58 2019.74,1656.33 U1.179@2019.74,1536.45
HA8: HDR2.8 U1.180 | length 390.6
  Top Layer w7.87: HDR2.8@1935.49,1840.58 1892.77,1797.87 1892.77,1719.52 1918.36,1693.93 1959.87,1693.93 2000.06,1653.74 U1.180@2000.06,1536.45
HA9: HDR2.9 U1.176 | length 222.1
  Top Layer w7.87: HDR2.9@2035.49,1740.58 2078.8,1697.28 U1.176@2078.8,1536.45
HA10: HDR2.10 U1.178 | length 348.2
  Top Layer w7.87: HDR2.10@2035.49,1840.58 1984.31,1789.4 1984.31,1718.54 2039.43,1663.42 U1.178@2039.43,1536.45
HA11: HDR2.11 U1.174 | length 211.3
  Top Layer w7.87: U1.174@2118.17,1536.45 2118.17,1678.18 2135.49,1695.5 HDR2.11@2135.49,1740.58
HA12: HDR2.12 U1.175 | length 330.9
  Top Layer w7.87: U1.175@2098.48,1536.45 2098.48,1703.77 2084.7,1717.55 2084.7,1789.8 HDR2.12@2135.49,1840.58
HA13: HDR2.13 U1.169 | length 212
  Top Layer w7.87: U1.169@2216.59,1536.45 2216.59,1628.85 2235.49,1647.75 HDR2.13@2235.49,1740.58
HA14: HDR2.14 U1.173 | length 344.6
  Top Layer w7.87: U1.173@2137.85,1536.45 2137.85,1657.51 2183.13,1702.79 2183.13,1788.22 HDR2.14@2235.49,1840.58
HA15: HDR2.15 U1.167 | length 237.1
  Top Layer w7.87: U1.167@2255.96,1536.45 2255.96,1623.68 2335.49,1703.21 HDR2.15@2335.49,1740.58
HA16: HDR2.16 U1.168 | length 345.2
  Top Layer w7.87: U1.168@2236.28,1536.45 2236.28,1626.27 2278.6,1668.59 2278.6,1783.69 HDR2.16@2335.49,1840.58
HA17: HDR2.17 U1.165 | length 272.6
  Top Layer w7.87: U1.165@2295.33,1536.45 2295.33,1618.14 2417.77,1740.58 HDR2.17@2435.49,1740.58
HA18: HDR2.18 U1.166 | length 370.3
  Top Layer w7.87: U1.166@2275.65,1536.45 2275.65,1621.09 2383.91,1729.36 2383.91,1789.01 HDR2.18@2435.49,1840.58
HA19: HDR2.19 U1.164 | length 351.4
  Top Layer w7.87: U1.164@2315.02,1536.45 2315.02,1615.56 2397.73,1698.27 2455.18,1698.27 2497.5,1740.58 HDR2.19@2535.49,1740.58
HARD_TCK: HDR1.3 U1.207 U5.6 | length 2962.9
  Top Layer w7.87: U1.207@1468.56,1536.45 v1(1468.56,1738.22) ; U5.6@2753.99,1348.46 2753.99,1300 2804.94,1249.06 v1(2804.94,1239.87)
  Bottom Layer w7.87: HDR1.3@1026.04,1848.46 1026.04,1878.38 1063.05,1915.39 2599.83,1915.39 2716.59,1798.63 2716.59,1672.28 ; v1(1468.56,1738.22) 1468.56,1915.39 ; 2716.59,1672.64 2725.45,1663.78 2725.45,1663.42 2894.74,1494.13 2894.74,1339.68 2804.94,1249.87 v1(2804.94,1239.87)
HARD_TDI: HDR1.1 U1.159 | length 1487
  Top Layer w7.87: U1.159@2413.44,1536.45 2413.44,1582.71 v1(2435.09,1604.36)
  Bottom Layer w7.87: HDR1.1@1126.04,1848.46 1212.65,1848.46 1410.49,1650.62 2388.83,1650.62 v1(2435.09,1604.36)
HARD_TDO: HDR1.2 U5.17 | length 2551
  Top Layer w7.87: U5.17@2805.17,1129.95 v1(2805.17,1192.94)
  Bottom Layer w7.87: HDR1.2@1126.04,1748.46 1074.84,1799.65 1074.84,1883.87 1090.61,1899.64 1189.03,1899.64 1422.3,1666.37 2700.22,1666.37 2748.97,1617.62 2878.99,1487.6 2878.99,1358.93 2775.26,1255.2 2775.26,1222.86 v1(2805.17,1192.94)
HARD_TMS: HDR1.4 U1.2 U5.5 | length 3274.4
  Top Layer w7.87: HDR1.4@1026.04,1748.46 1026.04,1683.1 1277.02,1432.12 U1.2@1364.23,1432.12 ; U5.5@2779.58,1348.46 2779.58,1307.12 2841.83,1244.87 v1(2854.94,1244.87)
  Bottom Layer w7.87: HDR1.4@1026.04,1748.46 982.34,1792.16 982.34,1870.11 1043.56,1931.33 2606.16,1931.33 2732.34,1805.15 2732.34,1679.17 2910.49,1501.02 2910.49,1325.43 2854.94,1269.87 v1(2854.94,1244.87)
HB2: HDR3.2 U1.163 | length 871.6
  Top Layer w7.87: U1.163@2334.7,1536.45 2334.7,1612.97 2404.25,1682.52 2840.76,1682.52 2972.57,1814.33 2998.82,1840.58 HDR3.2@3035.49,1840.58
HB3: HDR3.3 U1.160 | length 866.6
  Top Layer w7.87: U1.160@2393.76,1536.45 2393.76,1605.21 2423.82,1635.28 2860.33,1635.28 2923.23,1698.18 3072.22,1698.18 3114.62,1740.58 HDR3.3@3135.49,1740.58
HB4: HDR3.4 U1.162 | length 950.4
  Top Layer w7.87: U1.162@2354.39,1536.45 2354.39,1610.38 2410.78,1666.77 2847.28,1666.77 2978.77,1798.26 3093.17,1798.26 HDR3.4@3135.49,1840.58
HB5: HDR3.5 U1.138 | length 1290.1
  Top Layer w7.87: U1.138@2537.46,1097.47 2587.29,1097.47 2648.16,1036.6 2902.77,1036.6 2927.22,1061.06 2927.22,1530.91 3085.32,1689.01 3183.91,1689.01 HDR3.5@3235.49,1740.58
HB6: HDR3.6 U1.161 | length 1029.2
  Top Layer w7.87: U1.161@2374.07,1536.45 2374.07,1607.8 2417.3,1651.03 2853.81,1651.03 2985.29,1782.51 3177.42,1782.51 HDR3.6@3235.49,1840.58
HB7: HDR3.7 U1.135 | length 1423.7
  Top Layer w7.87: U1.135@2537.46,1038.42 2601.8,1038.42 2638.22,1002 2919.35,1002 2958.72,1041.37 2958.72,1517.86 3098.36,1657.51 3278.23,1657.51 3304.19,1683.47 3304.19,1684.09 3321.91,1684.09 3335.49,1697.67 HDR3.7@3335.49,1740.58
HB8: HDR3.8 U1.136 | length 1493.4
  Top Layer w7.87: U1.136@2537.46,1058.1 2604.39,1058.1 2644.74,1017.75 2909.5,1017.75 2942.97,1051.21 2942.97,1524.39 3091.84,1673.26 3271.71,1673.26 3288.44,1689.99 3288.44,1793.54 HDR3.8@3335.49,1840.58
HB9: HDR3.9 U1.133 | length 1552.2
  Top Layer w7.87: U1.133@2537.46,999.05 2595.53,999.05 2624.07,970.5 2939.03,970.5 2990.21,1021.68 2990.21,1380.94 2990.21,1504.82 3111.41,1626.02 3291.28,1626.02 3317.85,1652.59 3416.39,1652.59 3435.49,1671.69 HDR3.9@3435.49,1740.58
HB10: HDR3.10 U1.134 | length 1601
  Top Layer w7.87: U1.134@2537.46,1018.73 2598.11,1018.73 2630.59,986.25 2929.19,986.25 2974.46,1031.53 2974.46,1511.34 3104.89,1641.76 3284.75,1641.76 3311.33,1668.34 3356.35,1668.34 3386.87,1698.85 3386.87,1791.96 HDR3.10@3435.49,1840.58
HB11: HDR3.11 U1.129 | length 1671.6
  Top Layer w7.87: U1.129@2537.46,920.31 2599.46,920.31 2614.41,935.25 2952.99,935.25 3021.71,1003.97 3021.71,1403.57 3021.71,1491.77 3124.46,1594.52 3304.32,1594.52 3330.9,1621.09 3498.09,1621.09 3535.49,1658.5 HDR3.11@3535.49,1740.58
HB12: HDR3.12 U1.132 | length 1732.7
  Top Layer w7.87: U1.132@2537.46,979.36 2592.57,979.36 2617.18,954.76 2948.87,954.76 3005.96,1011.84 3005.96,1498.3 3117.93,1610.27 3297.8,1610.27 3324.38,1636.84 3455.76,1636.84 3485.29,1666.37 3485.29,1790.39 HDR3.12@3535.49,1840.58
HB13: HDR3.13 U1.126 | length 1837.4
  Top Layer w7.87: U1.126@2537.46,861.25 2609.31,861.25 2636.87,833.69 2898.68,833.69 3053.2,988.22 3053.2,1394.72 3053.2,1478.73 3137.5,1563.02 3317.37,1563.02 3342.96,1588.61 3594.44,1588.61 3635.49,1629.67 HDR3.13@3635.49,1740.58
HB14: HDR3.14 U1.127 | length 1902.4
  Top Layer w7.87: U1.127@2537.46,880.94 2613.24,880.94 2644.74,849.44 2890.8,849.44 3037.46,996.09 3037.46,1395.7 3037.46,1485.25 3130.98,1578.77 3310.85,1578.77 3336.44,1604.36 3560.09,1604.36 3583.72,1627.98 3583.72,1788.81 HDR3.14@3635.49,1840.58
HB15: HDR3.15 U1.123 | length 1908.1
  Top Layer w7.87: U1.123@2537.46,802.2 2914.43,802.2 3084.7,972.47 3084.7,1465.68 3150.55,1531.53 3330.42,1531.53 3356.01,1557.12 3607.48,1557.12 3735.49,1685.12 HDR3.15@3735.49,1740.58
HB16: HDR3.16 U1.125 | length 1997.5
  Top Layer w7.87: U1.125@2537.46,841.57 2605.37,841.57 2628.99,817.94 2906.55,817.94 3068.95,980.35 3068.95,1376.02 3068.95,1472.2 3144.03,1547.28 3323.89,1547.28 3349.48,1572.87 3600.96,1572.87 3685.09,1657 3685.09,1790.19 HDR3.16@3735.49,1840.58
HB17: HDR3.17 U1.121 | length 1993.2
  Top Layer w7.87: U1.121@2537.46,762.83 2921.68,762.83 3116.2,957.34 3116.2,1452.63 3163.59,1500.03 3343.46,1500.03 3368.07,1524.64 3619.54,1524.64 HDR3.17@3835.49,1740.58
HB18: HDR3.18 U1.122 | length 2072
  Top Layer w7.87: U1.122@2537.46,782.51 2919.1,782.51 3100.45,963.86 3100.45,1459.16 3157.07,1515.78 3336.94,1515.78 3362.53,1541.37 3614,1541.37 3787.46,1714.82 3787.46,1792.55 HDR3.18@3835.49,1840.58
HB19: HDR3.19 U1.120 | length 2101.3
  Top Layer w7.87: U1.120@2537.46,743.14 2924.27,743.14 3132.93,951.8 3132.93,1447.1 3170.12,1484.28 3349.98,1484.28 3374.59,1508.89 3627.02,1508.89 3794.97,1676.84 3871.74,1676.84 HDR3.19@3935.49,1740.58
I\N\I\T\: R5.2 U1.107 U5.8 | length 1282
  Top Layer w7.87: U1.107@2537.46,487.24 2622.1,487.24 v1(2631.94,477.39) ; v1(2664.43,1254.95) 2664.43,1270.7 2702.81,1309.09 U5.8@2702.81,1348.46 ; v1(2712.77,1457.9) R5.2@2763.83,1457.71
  Bottom Layer w7.87: v1(2631.94,477.39) 2675.25,520.7 2675.25,841.83 2664.43,852.66 2664.43,1409.55 v1(2712.77,1457.9)
JTAG_NEXUS_TCK: HDR1.7 U1.6 | length 779.1
  Top Layer w7.87: HDR1.7@826.04,1848.46 876.04,1798.46 876.04,1737.24 906.56,1706.72 932.15,1706.72 1285.49,1353.38 U1.6@1364.23,1353.38
JTAG_NEXUS_TDI: HDR1.5 U1.4 | length 679.3
  Top Layer w7.87: HDR1.5@926.04,1848.46 976.43,1798.06 976.43,1708.69 1292.38,1392.75 U1.4@1364.23,1392.75
JTAG_NEXUS_TDO: HDR1.6 U1.5 | length 601.3
  Top Layer w7.87: HDR1.6@926.04,1748.46 926.04,1735.46 1288.44,1373.06 U1.5@1364.23,1373.06
JTAG_NEXUS_TMS: HDR1.8 U1.7 | length 710
  Top Layer w7.87: HDR1.8@826.04,1748.46 883.52,1690.97 924.27,1690.97 1281.55,1333.69 U1.7@1364.23,1333.69
LCD_CONTRAST: LCD1.3 R1.W | length 825.3
  Top Layer w19.68: R1.W@-2346.4,1340.58 -2236.17,1340.58 -2192.86,1297.28 -1763.2,1297.28 -1630.65,1429.82 LCD1.3@-1630.65,1466.57
LCD_DB0: RA2.5 U1.20 | length 2710
  Top Layer w7.87: RA2.5@-1165.5,1188.03 -1165.5,1104.36 -1133.02,1071.88 -771.6,1071.88 -724.35,1024.64 138.24,1024.64 241.58,1127.98 1272.69,1127.98 1322.89,1077.79 U1.20@1364.23,1077.79
LCD_DB1: RA2.6 U1.18 | length 2640.6